# Altium PCB footprint.PcbDoc
Units mm, origin at the board's own origin, x right, y up, seen from the top; angles counter-clockwise.
Board outline 152.4 x 101.6 mm, 2 copper layers (Top Layer, Bottom Layer); 80 components, 0 nets, 626 pads, 2 vias.
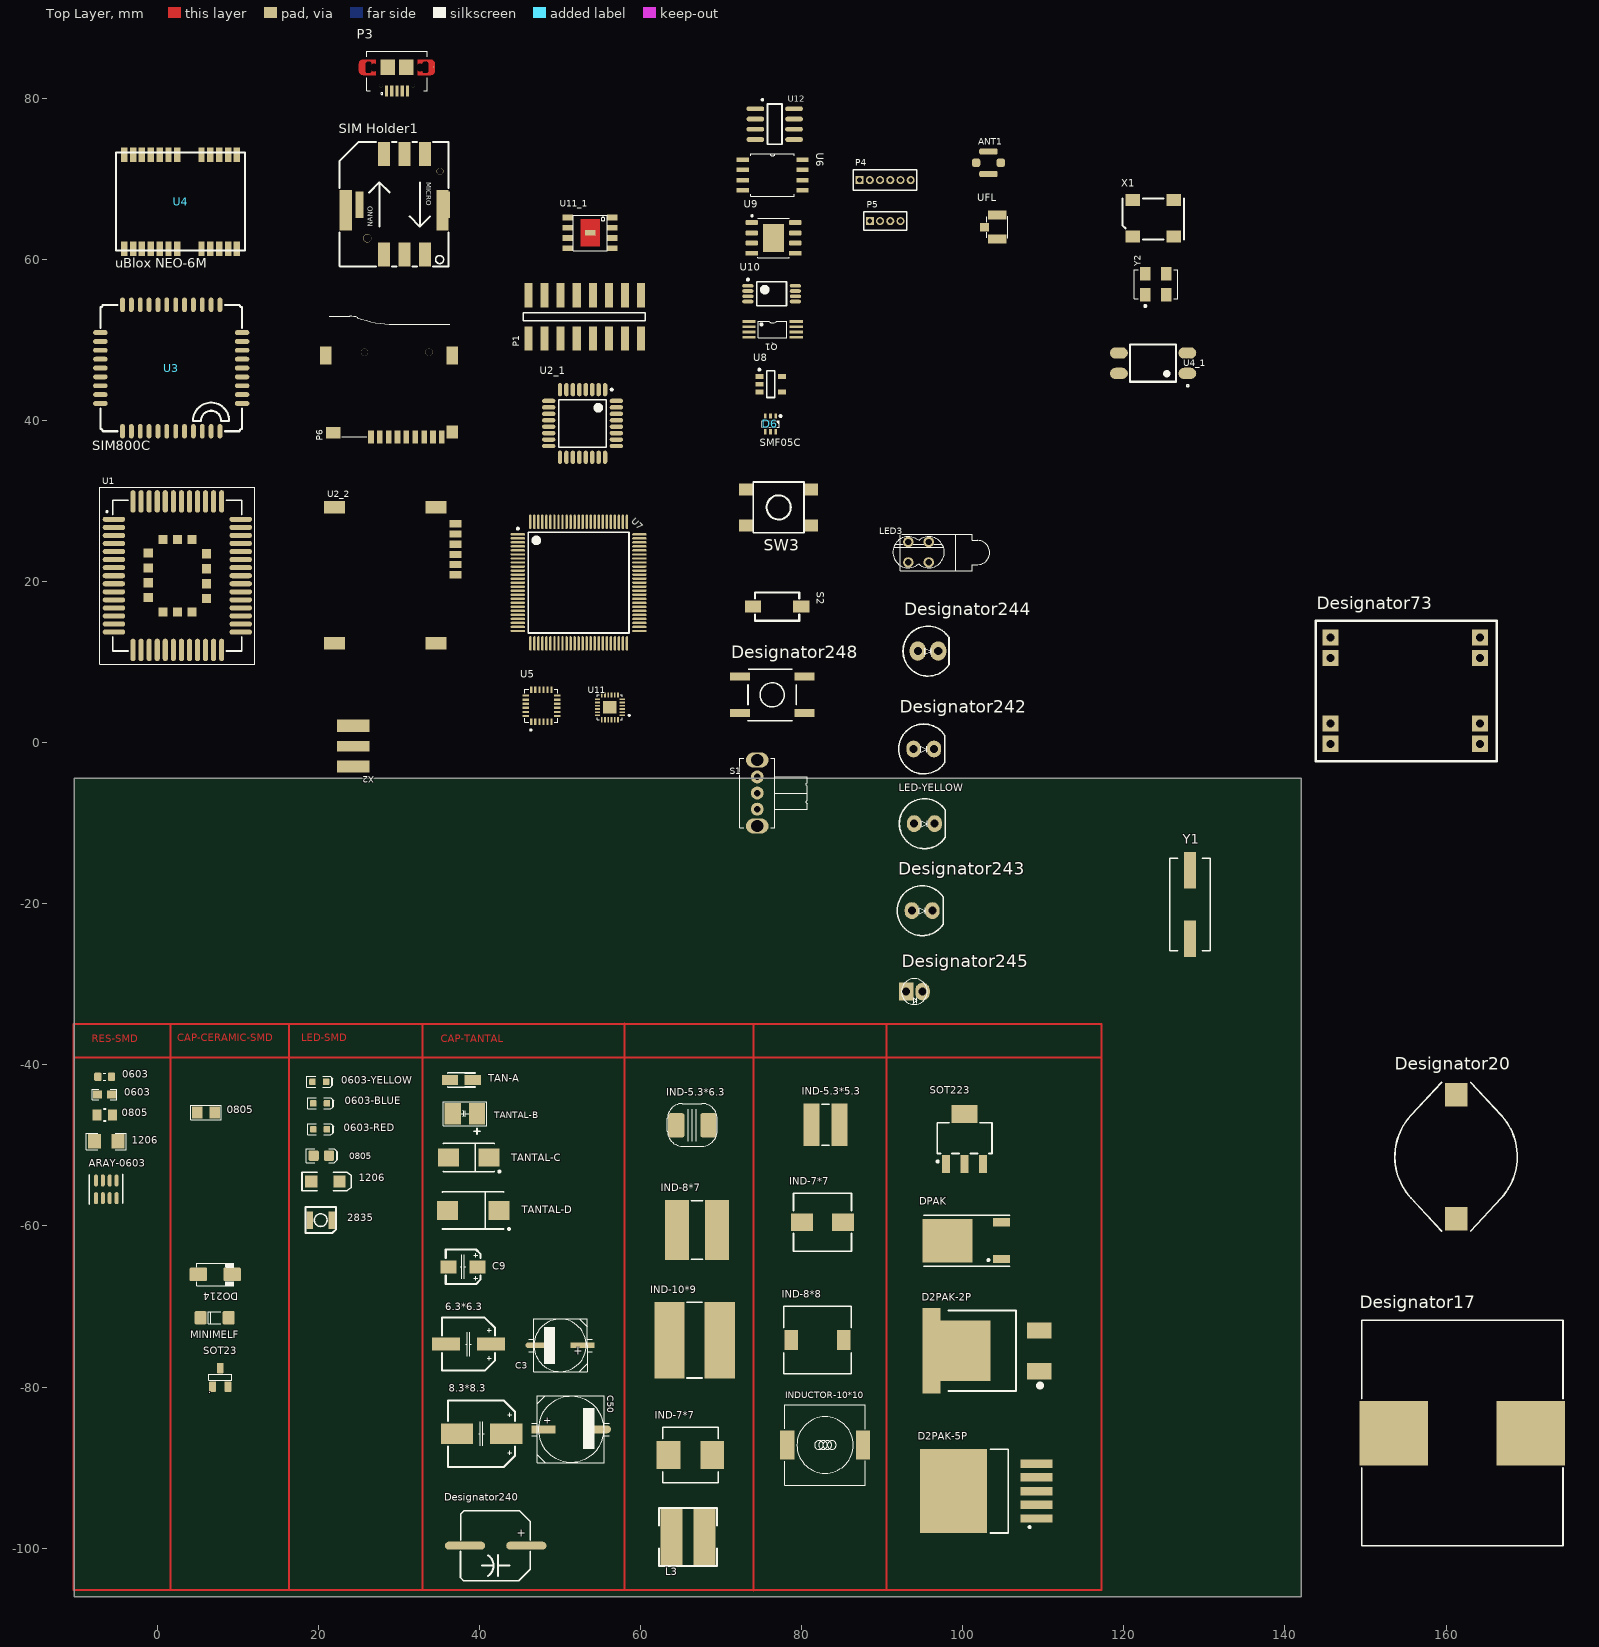
[diagram p0: Top Layer view]
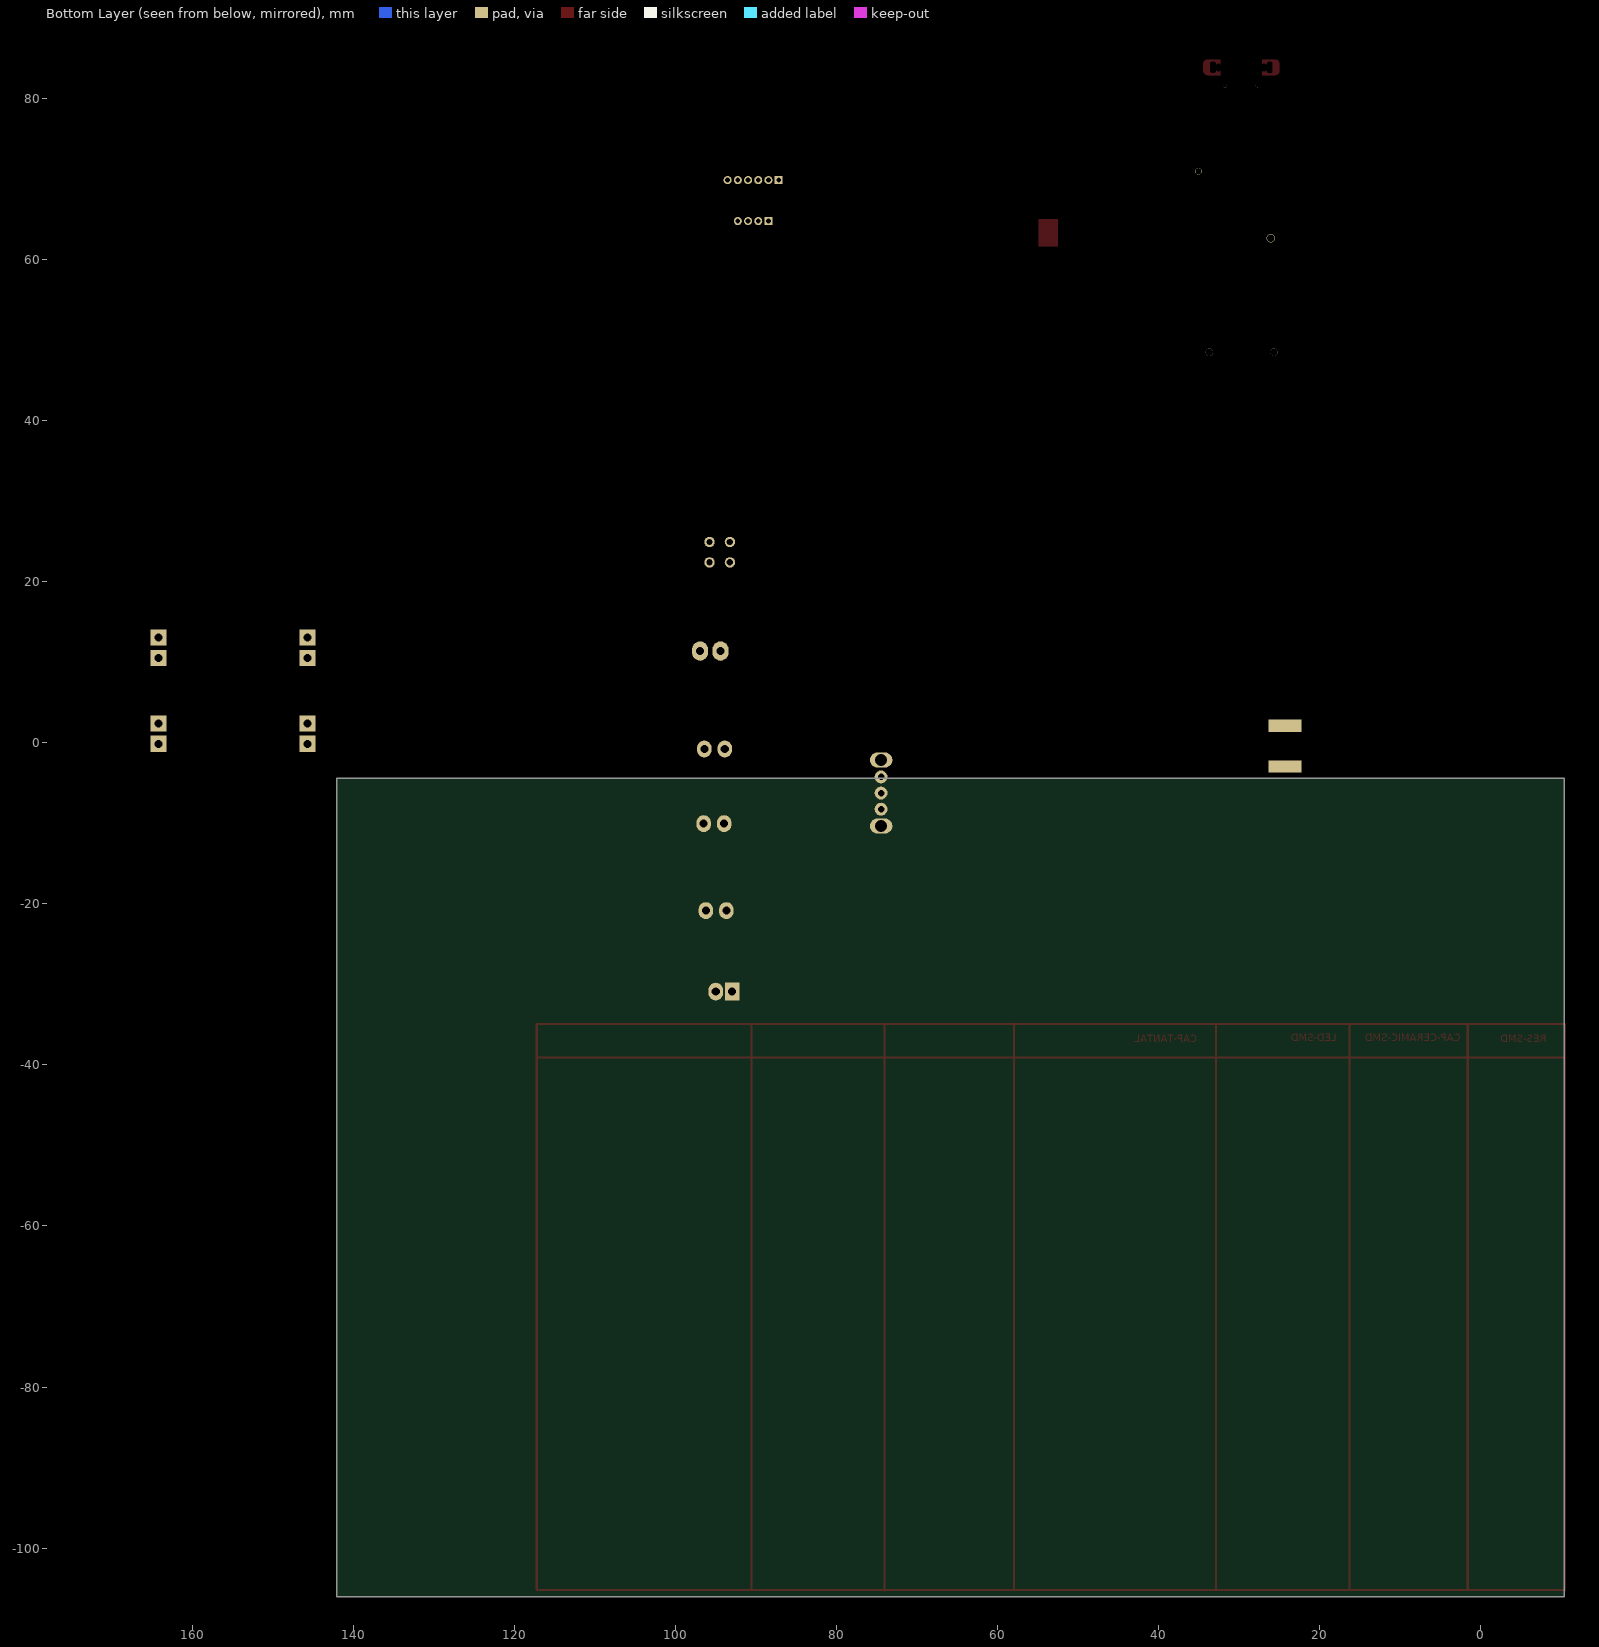
[diagram p1: Bottom Layer view, seen from below]

## Layer stack, top to bottom
Top Solder: solder mask 0.0102, Solder Resist, Dk 3.5
Top Layer: signal copper 0.0356
Dielectric 1: dielectric 0.32, FR-4, Dk 4.8
Bottom Layer: signal copper 0.0356
Bottom Solder: solder mask 0.0102, Solder Resist, Dk 3.5

## Board outline
-10.353,-106.038 142.047,-106.038 142.047,-4.438 -10.353,-4.438

## Design rules (kind name [scope] priority, off if disabled: settings)
Clearance [All] p1: gap=0.2 ignorepadtopadclearanceinfootprint=FALSE
PolygonConnect [All] p1: connectstyle=Relief reliefconductorwidth=0.254 reliefentries=4 polygonreliefangle="90 Angle" airgapwidth=0.254
RoutingVias [All] p1: holewidth=0.711 width=1.27 viastyle="Through Hole" minholewidth=0.711 minwidth=1.27 maxholewidth=0.711 maxwidth=1.27
SolderMaskExpansion [All] p1: expansion=0.102
Width [All] p1: maxlimit=0.254 minlimit=0.254 preferedwidth=0.254
30 further rules are at their usual default settings.

## Components (designator, comment, footprint, x,y, rotation, side; value= is the part's Value field where it differs from the comment)
6.3*6.3 "470uF" CAP_ELEC_D_6.3*5.8 38.625,-74.675 r270 top (schematic designator C15)
8.3*8.3 "100uF" CAP_ELEC_E_8*6.2 40.25,-85.8 r270 top (schematic designator C32)
0603 "Thick Film" 0603R -6.575,-43.7 r180 top (schematic designator R52)
0603 "1k" SMD-RES-0603-ARJ -6.554,-41.463 r180 bottom (schematic designator R4)
0603-BLUE "NET_B" LED-0603-BLUE 20.2,-44.775 r0 bottom (schematic designator LED2)
0603-RED "CHRG_R" LED-0603-RED 20.2,-48 r0 bottom (schematic designator LED4)
0603-YELLOW "GPS_Y" LED-0603-YELLOW 20.1,-42.1 r0 bottom (schematic designator LED3)
0805 "Comment" RES-0805 -6.55,-46.225 r180 top
0805 "RED" LED-0805-K 20.35,-51.275 r0 top (schematic designator LED1)
0805 "approved sub OK" 0805C 6.025,-45.9 r0 top (schematic designator C47)
1206 "Comment" RES-1206 -6.35,-49.5 r180 top
1206 "Comment" "LED 1206" 20.85,-54.475 r0 top
2835 "Comment" 1210(3528) 20.275,-59.275 r180 top
ANT1 "CONNECTOR_ANTENNA-U-FL" CONNECTOR_4P-U-FL 103.185,72.016 r0 top
ARAY-0603 "Comment" ARAY-0603 -6.35,-55.45 r90 top
C3 "100uF-16V" PANACAP-D-GENERIC 50,-74.825 r180 top
C9 "10uF" CAP_ELEC_B_4*5.8 37.95,-65.075 r270 top
C50 "47uF-50V" PANACAP-E-GENERIC 51.375,-85.25 r0 top
D2PAK-2P "Comment" PCBComponent_1 99.175,-75.5 r90 top
D2PAK-5P "Comment" D2PAK-5P 98.85,-92.925 r90 top
D6 "SMF05C" SC70-6 76.119,39.59 r270 top
Designator17 "Comment" WE-HCF_2920_Round 162.025,-85.725 r90 top
Designator20 "Comment" "WE-ASI_Actuator - Type L" 161.25,-51.4 r90 top
Designator73 "Comment" MP1584 154.946,6.471 r90 top
Designator240 "Comment" "CAP SMD 470uF" 42,-99.7 r0 top
Designator242 "Comment" LED5MM_RED 95.15,-0.775 r0 top
Designator243 "Comment" LED5MM_GRN 94.955,-20.85 r0 top
Designator244 "Comment" LED5MM_BLUE 95.68,11.375 r0 top
Designator245 "Comment" LED3mm_GRN 93.984,-30.9 r0 top
Designator248 "Comment" SW-PB#1 76.333,5.95 r0 top
DO214 "SS34" DO-214AC 7.182,-66.004 r0 top (schematic designator D7)
DPAK "Comment" DPAK 98.075,-61.825 r90 top
IND-5.3*5.3 "Comment" WE-SPC_4818 82.95,-47.45 r90 top
IND-5.3*6.3 "Comment" "Inductor SMD 3x3.2mm" 66.425,-47.5 r0 top
IND-7*7 "Comment" WE-HCI_7050#1 82.575,-59.525 r90 top
IND-7*7 "Comment" WE-LHMI_7030 66.175,-88.45 r180 top
IND-8*7 "Comment" WE-ASI_Sensor 67,-60.5 r180 top
IND-8*8 "Comment" WE-CHSA_8090 81.95,-74.175 r0 top
IND-10*9 "Comment" "WE-ASI_Actuator - Type M" 66.7,-74.175 r180 top
INDUCTOR-10*10 "CDRH105R-330" IND_SMD10X10 82.9,-87.2 r270 top (schematic designator L2)
L3 "100UH-7*7" WE-HCI_7050#2 65.875,-98.625 r270 top
LED3 "LTL-42D1NMHDP1" "LED DUAL G&Y" 94.505,23.655 r90 top
LED-YELLOW "Comment" LED5MM_YELLOW 95.225,-10.05 r0 top
MINIMELF "1N4148" "SOD80, LL-34" 7.1,-71.4 r0 top (schematic designator D5)
P1 "16 PIN" NSO16_M 52.493,52.822 r270 top
P3 "Conn Micro USB 2.0 Type B Modified for GPS unit" "HRS_ZX62D-B-5P8 - 1028MMC" 29.749,80.906 r180 top
P4 "MHDR1X6" MHDR1X6 87.183,69.857 r0 top
P5 "MHDR1X4" MHDR1X4 88.453,64.777 r0 top
P6 "ST-TF-003A" SD_CARDSUNTECH_ST-TF-003A_ST-TF-003A(PRIMARY) 30.033,43.314 r180 top
Q1 "IRF7701" TSSOP-8 76.388,51.315 r0 top
S1 "Switch SPDT_Subminiator" "SPDT SUBMINIATOR" 74.475,-6.25 r270 top
S2 "SW-PB" SW-PB#2 76.944,16.898 r0 top
"SIM Holder1" "SIMCARD6PIN" MICRO/NANO-Flat 36.134,73.615 r180 top
SOT23 "C945" SOT23-3 7.8,-78.8 r90 top (schematic designator Q8)
SOT223 "3V3" SOT223 100.225,-49.1 r90 top (schematic designator UP2)
SW3 "Comment" B3FS_SWITCH 77.15,29.217 r0 top
TAN-A "" Cap_A 37.75,-41.875 r180 bottom (schematic designator C28)
TANTAL-B "2.2uF-16V" C(1210) 38.175,-46.075 r180 top (schematic designator C56)
TANTAL-C "100uF-10V" Cap_C 38.65,-51.5 r180 top (schematic designator C31)
TANTAL-D "470uF" Cap_D 39.2,-58.075 r180 top (schematic designator C14)
U1 "MC60" XCVR_MC60 2.474,20.739 r0 top
U2_1 "ATmega328P-AU" 32A_N 52.785,39.64 r270 top (schematic designator U2)
U2_2 "CONNECTOR_MICROSIM" CONNECTOR_MICROSIM 36.205,28.426 r180 top (schematic designator U2)
U3 "SIM800C" SIM800C 1.714,46.526 r270 top
U4 "uBlox NEO-6M" NEO_6 -5.126,61.094 r270 top
U4_1 "PC817X2NIP0F" SOT254P975X400-4N 123.632,47.124 r180 top (schematic designator U4)
U5 "MPU-6050 Six-Axis (Gyro + Accelerometer) MEMS MotionTracking™ Devices" QFN50P400X400X95-24N 47.686,4.579 r90 top
U6 "32-megabit DataFlash" SOIC127P798X216-8N 76.388,70.492 r0 top
U7 "STM32F407VGT6" STM-LQFP100_N 52.298,19.876 r0 top
U8 "PQ1X331M2ZPH" SOT95P280X130-5N 76.137,44.518 r0 top
U9 "3A, 1.5MHz, 28V Step-Down Converter" SOIC9 76.496,62.684 r0 top
U10 "FS8205A" TSSOP-8N 76.261,55.76 r0 top
U11 "MPU-9250" QFN40P300X300X105-25N 56.174,4.398 r180 top (schematic designator U3)
U11_1 "TP4056" SOP-8 53.725,63.31 r180 bottom locked (schematic designator U11)
U12 "TS02" "TS02N - SOP8" 74.105,78.301 r0 top (schematic designator U5)
UFL "U.FL Series" U.FL-R-SMT 104.275,64.025 r270 top (schematic designator J2)
X1 "Crystal resonator" "Crystal Oscillator - 8MHz" 121.092,63.122 r0 top
X2 "SMA Connector Edge" SMA_EDGELAUNCH 26.35,-0.425 r180 top
Y1 "16 MHz" "Crystal SMD" 128.21,-20.075 r270 top value="12 MHz"
Y2 "7C-8MBF-T" OSC_5X3 123.983,56.933 r0 top

## Footprints (in the part's own frame and the unit in brackets; to place one, negate y for a bottom-side part, rotate by r counter-clockwise, add the part's x,y. Pads: shape width x height; smd on the part's side, far side on the other; paste and mask are expansions set on the pad)
32A_N [mm] "Thin QFP, 32-Leads, Body 7x7mm, Pitch 0.8mm, IPC Medium Density"
  oval 1.65x0.55 smd: 1(-4.2,2.8) 2(-4.2,2) 3(-4.2,1.2) 4(-4.2,0.4) 5(-4.2,-0.4) 6(-4.2,-1.2) 7(-4.2,-2) 8(-4.2,-2.8) 17(4.2,-2.8) 18(4.2,-2) 19(4.2,-1.2) 20(4.2,-0.4) 21(4.2,0.4) 22(4.2,1.2) 23(4.2,2) 24(4.2,2.8)
  oval 0.55x1.65 smd: 9(-2.8,-4.2) 10(-2,-4.2) 11(-1.2,-4.2) 12(-0.4,-4.2) 13(0.4,-4.2) 14(1.2,-4.2) 15(2,-4.2) 16(2.8,-4.2) 25(2.8,4.2) 26(2,4.2) 27(1.2,4.2) 28(0.4,4.2) 29(-0.4,4.2) 30(-1.2,4.2) 31(-2,4.2) 32(-2.8,4.2)
  silkscreen extent -4.32,-2.95 2.95,3.75, body extent -3.5,-3.5 3.5,3.5, height 1.2
0603R [mm]
  rect 1.1x1 smd: 1(-0.85,0) 2(0.85,0)
  Top Layer pour cut-out: -0.254,-0.635 0.254,-0.635 0.254,0.635 -0.254,0.635
  silkscreen extent -1.55,-0.66 1.55,0.66, body extent -0.8,-0.42 0.8,0.43, height 0.45
0805C [mil]
  rect 51x59 smd: 1(-43.31,0) 2(43.31,0)
  Top Layer pour cut-out: 15,35 15,-35 -15,-35 -15,35
  silkscreen extent -75,-35 75,35, body extent -39,-25 39,25, height 31
1210(3528) [mm]
  rect 0.8x2.2 smd mask+0: +(1.35,0) -(-1.35,0)
  silkscreen extent -1.9,-1.6 1.9,1.6
ARAY-0603 [mm]
  oval 1.5x0.5 smd: 1(1.1,1.275) 2(1.1,0.425) 3(1.1,-0.425) 4(1.1,-1.275) 5(-1.1,-1.275) 6(-1.1,-0.425) 7(-1.1,0.425) 8(-1.1,1.275)
  silkscreen extent -1.83,-2.05 1.85,2.1
B3FS_SWITCH [mm]
  rect 1.8x1.5 smd: 1(3.998,-2.244) 2(-4.012,-2.244) 3(3.998,2.246) 4(-4.012,2.246)
  silkscreen extent -3.17,-3.15 3.14,3.16, body extent -4.57,-3.15 4.57,3.16, height 4.57
C(1210) [mm]
  rect 2x2.7 smd: 1(-1.5,0) 2(1.5,0)
  silkscreen extent -2.69,-1.5 2.69,2.54, body extent -1.85,-1.46 1.85,1.47, height 2.03
"CAP SMD 470uF" [mm] "SMD CAP 470uF"
  oval 5x1 smd: 1(3.81,0) 2(-3.81,0)
  silkscreen extent -4.37,-4.34 4.29,4.34, body extent -4.53,-4.15 4.47,4.15, height 12
Cap_A [mm] "Capacitor, SM Tantalum; Body 3.2 x 1.6 mm (LxW typ)"
  rect 2x1.2 smd far side: 1(-1.4,0) 2(1.4,0)
  body extent -1.6,-0.8 1.6,0.8, height 1.6
Cap_C [mm] "Capacitor, SM Tantalum; Body 6.0 x 3.2 mm (LxW typ)"
  rect 2.6x2.2 smd: 1(-2.5,0) 2(2.5,0)
  silkscreen extent -3.93,-1.75 3.15,1.87, body extent -3,-1.6 3,1.6, height 2.5
Cap_D [mm] "Capacitor, SM Tantalum; Body 7.3 x 4.3 mm (LxW typ)"
  rect 2.6x2.4 smd: 1(-3.2,0) 2(3.2,0)
  silkscreen extent -4.58,-2.3 3.8,2.42, body extent -3.65,-2.15 3.65,2.15, height 2.8
CAP_ELEC_B_4*5.8 [mm] "Size B - Diameter 4 - Height 5.8"
  rect 1.6x2 smd: 1(0,1.8) 2(0,-1.8)
  silkscreen extent -2.15,-2.15 2.15,2.15
CAP_ELEC_D_6.3*5.8 [mm] "Size D - Diameter 6.3 - Height 5.8"
  rect 1.6x3.5 smd: 1(0,2.8) 2(0,-2.8)
  silkscreen extent -3.3,-3.3 3.3,3.3
CAP_ELEC_E_8*6.2 [mm] "Size E - Diameter 8 - Height 6.2"
  rect 2.5x4 smd: 1(0,3.05) 2(0,-3.05)
  silkscreen extent -4.15,-4.15 4.15,4.15
CONNECTOR_4P-U-FL [mil]
  rrect50% 40x40 smd: D(-60,0) GND3(60,0)
  rrect50% 90x30 smd: GND1(0,55) GND2(0,-55)
CONNECTOR_MICROSIM [mil]
  rect 59.06x35.43 smd: 1(-31.5,98.43) 2(-31.5,198.43) 3(-31.5,298.43) 5(-31.5,48.43) 6(-31.5,148.43) 7(-31.5,248.43)
  rect 102.76x61.42 smd: 5(62.99,633.86) 5(62.99,-31.5) 5(559.06,633.86) 5(559.06,-31.5)
  body extent -43,-23 635,627, height 61
"Crystal Oscillator - 8MHz" [mm]
  rect 1.8x1.5 smd: 1(0,-0.25) 2(5.08,-0.25) 3(5.08,4.25) 4(0,4.25)
  silkscreen extent -1.27,-0.64 6.35,4.44
"Crystal SMD" [mm] "DESIGNER ABBAS BASEREH"
  rect 4.5x1.5 smd: 1(-4.25,0) 2(4.25,0)
  silkscreen extent -5.75,-2.5 5.75,2.5, body extent -6.21,-2.25 6.09,2.25, height 5.18
D2PAK-5P [mm]
  rect 1.05x4 smd: 1(-3.4,-10.3) 2(-1.7,-10.3) 3(0,-10.3) 4(1.7,-10.3) 5(3.4,-10.3)
  rect 10.45x8.3 smd paste-5: 6(0,0)
  silkscreen extent -5.2,-9.58 5.2,-4.55, body extent -5.2,-6.8 5.2,2.6, height 4.65
DO-214AC [mm] "JEDEC DO214 variation AC. SMA"
  round 0.508 on Mech15: 0(0,0)
  rrect25% 2.2x1.7 smd: A(-2.1,0) K(2.1,0)
  silkscreen extent -2.3,-1.4 2.3,1.4, body extent -2.6,-1.3 2.6,1.3, height 2.42
DPAK [mm]
  rect 1x2.1 smd: 1(-2.285,-6.75) 3(2.285,-6.75)
  rect 5.4x6.2 smd paste-3: 2(0,0)
  silkscreen extent -3.17,-7.77 3.18,2.93, body extent -3.39,-6.85 3.34,3.25, height 2.4
"HRS_ZX62D-B-5P8 - 1028MMC" [mm]
  rect 0.4x1.372 smd: 1(1.3,0) 2(0.65,0) 3(0,0) 4(-0.65,0) 5(-1.3,0)
  round 0.61 hole 1: 6(-2.85,-2.95) 6(2.85,-2.95)
  round 0.406 hole 0.5: 6(-2,-0.675) 6(2,-0.675)
  rect 0.102x0.102 smd: P3(-4.513,-2.987) P6(4.521,-2.963)
  rect 1.803x1.905 smd: P4(-1.15,-2.95) P5(1.15,-2.95)
  Top Layer region: -2.6,-2 -4.2,-2 -4.391,-2.038 -4.554,-2.146 -4.662,-2.309 -4.7,-2.5 -4.7,-2.5 -4.7,-2.95 -3.925,-2.95 -3.925,-2.5 -3.902,-2.385 -3.837,-2.288 -3.74,-2.223 -3.625,-2.2 -3.625,-2.2 -3.4,-2.2 -3.285,-2.223 -3.188,-2.288 -3.123,-2.385 -3.1,-2.5 -3.1,-2.5 -3.1,-2.95 -2.6,-2.95
  Top Layer region: 2.616,-3.9 4.216,-3.9 4.41,-3.863 4.574,-3.755 4.685,-3.593 4.724,-3.4 4.724,-3.4 4.724,-2.95 3.937,-2.95 3.937,-3.4 3.913,-3.516 3.847,-3.613 3.748,-3.678 3.632,-3.7 3.632,-3.7 3.404,-3.7 3.294,-3.674 3.202,-3.608 3.142,-3.512 3.124,-3.4 3.124,-3.4 3.124,-2.95 2.616,-2.95
  Top Layer region: -3.1,-2.95 -2.6,-2.95 -2.6,-3.9 -4.2,-3.9 -4.45,-3.833 -4.633,-3.65 -4.7,-3.4 -4.7,-3.4 -4.7,-2.95 -3.925,-2.95 -3.925,-3.425 -3.904,-3.53 -3.844,-3.619 -3.755,-3.679 -3.65,-3.7 -3.65,-3.7 -3.4,-3.7 -3.285,-3.677 -3.188,-3.612 -3.123,-3.515 -3.1,-3.4 -3.1,-3.4
  Top Layer region: 3.124,-2.95 2.616,-2.95 2.616,-2 4.216,-2 4.41,-2.037 4.574,-2.145 4.685,-2.307 4.724,-2.5 4.724,-2.5 4.724,-2.95 3.937,-2.95 3.937,-2.475 3.915,-2.369 3.854,-2.28 3.764,-2.22 3.658,-2.2 3.658,-2.2 3.404,-2.2 3.294,-2.226 3.202,-2.292 3.142,-2.388 3.124,-2.5 3.124,-2.5
  silkscreen extent -3.75,-4.95 3.76,0.43
IND_SMD10X10 [mm]
  rect 3.56x1.78 smd: 1(0,-4.7) 2(0,4.7)
  silkscreen extent -5,-5 5,5, body extent -5.21,-5.2 5.19,5.2, height 4.91
"Inductor SMD 3x3.2mm" [mm] "Inductor 4.7µH SMD 3x3.2mm"
  round 0.508 on Mech15: 0(0,0)
  rrect25% 2x3 smd: 1(-2,0) 2(2,0)
  silkscreen extent -3.1,-2.6 3.1,2.7, body extent -2.9,-2.6 2.89,2.6, height 4.5
LED3mm_GRN [mm]
  rect 1.8x2.2 hole 1: 1(-1.016,0)
  oval 1.8x2.2 hole 1: 2(1.016,0)
  silkscreen extent -1.6,-1.6 1.6,1.6, body extent -1.75,-1.75 1.75,1.75, height 3.9
LED5MM_BLUE [mm] "LED 5MM THROUGH HOLE BLUE-Designer Abbas Basereh"
  oval 2x2.4 hole 1: 1(-1.27,0) 2(1.27,0)
  silkscreen extent -3.1,-3.1 2.6,3.1, body extent -2.99,-2.98 2.43,3.04, height 12.31
LED5MM_GRN [mm] "LED 5MM THROUGH HOLE GREEN-Designer Abbas Basereh"
  oval 1.8x2.1 hole 1: 1(-1.27,0) 2(1.27,0)
  silkscreen extent -3.1,-3.1 2.6,3.1, body extent -3,-3 2.5,3, height 9.14
LED5MM_RED [mm] "LED 5MM THROUGH HOLE RED-Designer Abbas Basereh"
  oval 1.8x2.1 hole 1: 1(-1.27,0) 2(1.27,0)
  silkscreen extent -3.1,-3.1 2.6,3.1, body extent -2.97,-3 2.45,3.02, height 12.31
LED5MM_YELLOW [mm] "LED 5MM THROUGH HOLE YELLOW-Designer Abbas Basereh"
  oval 1.8x2.1 hole 1: 1(-1.27,0) 2(1.27,0)
  silkscreen extent -3.1,-3.1 2.6,3.1, body extent -3,-3.01 2.42,3.01, height 12.31
"LED 1206" [mm]
  rect 1.5x1.5 smd: 1(-1.75,0) 2(1.75,0)
  silkscreen extent -2.9,-1.15 3.2,1.15, body extent -1.65,-0.72 1.65,0.73, height 1.36
"LED DUAL G&Y" [mm]
  round 1.3 hole 0.8: 1(-1.27,1.27) 2(1.27,1.27) 3(-1.27,-1.27) 4(1.27,-1.27)
  silkscreen extent -2.29,-8.83 2.21,3.2, body extent -2.18,-10.09 2.12,2.3, height 9.7
LED-0603-BLUE [mm]
  round 0.254 on Mech15: 0(0,0)
  rrect25% 0.8x0.8 smd far side: A(-0.85,0) K(0.85,0)
  Top Layer pour cut-out: -0.5,0.5 0.5,0.5 0.5,-0.5 -0.5,-0.5
  body extent -0.8,-0.4 0.8,0.4, height 0.75
LED-0603-RED [mm]
  round 0.254 on Mech15: 0(0,0)
  rrect25% 0.8x0.8 smd far side: A(-0.85,0) K(0.85,0)
  Top Layer pour cut-out: -0.5,0.5 0.5,0.5 0.5,-0.5 -0.5,-0.5
  body extent -0.8,-0.4 0.8,0.4, height 0.75
LED-0603-YELLOW [mm]
  round 0.254 on Mech15: 0(0,0)
  rrect25% 0.8x0.8 smd far side: A(-0.85,0) K(0.85,0)
  Top Layer pour cut-out: -0.5,0.5 0.5,0.5 0.5,-0.5 -0.5,-0.5
  body extent -0.8,-0.4 0.8,0.4, height 0.75
LED-0805-K [mil]
  round 20 on Mech15: 0(0,0)
  rrect25% 50x50 smd: A(-37.5,0) K(37.5,0)
  Top Layer pour cut-out: -15,30 15,30 15,-30 -15,-30
  silkscreen extent -73,-35 77,35, body extent -39,-25 39,25, height 31
MHDR1X4 [mm] "Connector; Header; 4 Position"
  rect 1x1 hole 0.6: 1(0,0)
  round 1 hole 0.6: 2(1.27,0) 3(2.54,0) 4(3.81,0)
  silkscreen extent -0.76,-1.14 4.57,1.14, body extent -0.63,-1.2 4.45,1.2, height 4.85
MHDR1X6 [mm] "Connector; Header; 6 Position"
  rect 1x1 hole 0.6: 1(0,0)
  round 1 hole 0.6: 2(1.27,0) 3(2.54,0) 4(3.81,0) 5(5.08,0) 6(6.35,0)
  silkscreen extent -0.76,-1.27 7.11,1.27, body extent -0.63,-1.2 6.99,1.2, height 4.85
MICRO/NANO-Flat [mm]
  rect 1.5x3 smd: 1(2.9,13) 2(5.44,13) 3(7.98,13) 4(2.9,0.5) 5(5.44,0.5) 6(7.98,0.5)
  rect 0.9x1 smd: 1(3.18,12.775) 2(5.72,12.775) 3(8.26,12.775) 4(3.18,0.825) 5(5.72,0.825) 6(8.26,0.825)
  rect 1x3.29 smd: 4(0.28,6.805) 4(11.05,6.805)
  rect 1.5x5 smd: 4(0.75,7.5) 4(12.75,7.5)
  silkscreen extent 0,-1 13.5,14.5, body extent 1.6,0.55 11.95,13.1, height 1.03
MP1584 [mm]
  rect 2x2 hole 1: 1(4.064,-9.271) 1(6.604,-9.271) 2(-6.604,-9.271) 2(-4.064,-9.271) 3(4.064,9.271) 3(6.604,9.271) 4(-6.604,9.271) 4(-4.064,9.271)
  silkscreen extent -8.79,-11.35 8.69,11.13, body extent -8.55,-11.1 8.45,10.9, height 6.26
NEO_6 [mm]
  rect 1.8x0.8 smd: 1(-0.254,1) 2(-0.254,2.1) 3(-0.254,3.2) 4(-0.254,4.3) 5(-0.254,5.4) 6(-0.254,6.5) 7(-0.254,7.6) 8(-0.254,10.6) 9(-0.254,11.7) 10(-0.254,12.8) 11(-0.254,13.9) 12(-0.254,15) 13(-11.938,15) 14(-11.938,13.9) 15(-11.938,12.8) 16(-11.938,11.7) 17(-11.938,10.6) 18(-11.938,7.6) 19(-11.938,6.5) 20(-11.938,5.4) 21(-11.938,4.3) 22(-11.938,3.2) 23(-11.938,2.1) 24(-11.938,1)
  silkscreen extent -12.19,0 0,16
NSO16_M [mm] "SOIC, 16-Leads, Body 9.9x3.9mm, Pitch 1.27mm, IPC Low Density"
  rect 3x1 smd: 1(-2.75,-6.425) 2(-2.75,-4.425) 3(-2.75,-2.425) 4(-2.75,-0.425) 5(-2.75,1.575) 6(-2.75,3.575) 7(-2.75,5.575) 8(-2.75,7.575) 9(2.65,7.575) 10(2.65,5.575) 11(2.65,3.575) 12(2.65,1.575) 13(2.65,-0.425) 14(2.65,-2.425) 15(2.65,-4.425) 16(2.65,-6.425)
  silkscreen extent -0.58,-7.05 0.43,8.1
OSC_5X3 [mm]
  rect 1.3x1.7 smd mask+0.15: 1(-1.3,-1.3) 2(1.3,-1.3) 3(1.3,1.3) 4(-1.3,1.3)
  silkscreen extent -2.7,-2.82 2.7,1.8, body extent -2.57,-1.67 2.58,1.68, height 1.4
PANACAP-D-GENERIC [mm]
  rect 3x0.7 smd: +(-2.794,0)
  oval 3x0.7 smd: -(2.794,0)
  silkscreen extent -4,-3.3 3.92,3.3, body extent -3.5,-3.3 3.5,3.3, height 5.4
PANACAP-E-GENERIC [mm]
  rect 3x1 smd: 1(-3.429,0)
  oval 3x1 smd: 2(3.429,0)
  silkscreen extent -4.87,-4.15 4.75,4.15, body extent -4.63,-4.15 4.37,4.15, height 6.2
PCBComponent_1 [mm]
  rect 2x3 smd: 1(-2.54,-10.325) 2(2.54,-10.325)
  rect 2.032x2.286 smd paste-2: 3(-4.267,3.06) 3(4.267,3.06)
  rect 7.5x8.45 smd paste-5: 3(0,-0.025)
  silkscreen extent -5,-10.68 5,1
QFN40P300X300X105-25N [mm]
  rect 0.64x0.22 smd: 1(-1.545,1) 2(-1.545,0.6) 3(-1.545,0.2) 4(-1.545,-0.2) 5(-1.545,-0.6) 6(-1.545,-1) 13(1.545,-1) 14(1.545,-0.6) 15(1.545,-0.2) 16(1.545,0.2) 17(1.545,0.6) 18(1.545,1)
  rect 0.22x0.64 smd: 7(-1,-1.545) 8(-0.6,-1.545) 9(-0.2,-1.545) 10(0.2,-1.545) 11(0.6,-1.545) 12(1,-1.545) 19(1,1.545) 20(0.6,1.545) 21(0.2,1.545) 22(-0.2,1.545) 23(-0.6,1.545) 24(-1,1.545)
  rect 1.7x1.54 smd: 25(0,0)
  silkscreen extent -2.5,-1.55 1.55,1.55, body extent -1.51,-1.51 1.51,1.51, height 1
QFN50P400X400X95-24N [mil]
  rect 32x11 smd: 1(-77.56,50) 2(-77.56,30) 3(-77.56,10) 4(-77.56,-9.84) 5(-77.56,-29.53) 6(-77.56,-49.21) 13(78,-49.21) 14(78,-29.53) 15(78,-9.84) 16(78,10) 17(78,30) 18(78,50)
  rect 11x32 smd: 7(-49.21,-77.56) 8(-29.53,-77.56) 9(-9.84,-77.56) 10(10,-77.56) 11(30,-77.56) 12(50,-77.56) 19(50,78) 20(30,78) 21(10,78) 22(-9.84,78) 23(-29.53,78) 24(-49.21,78)
  silkscreen extent -122,-81 81,81
RES-0805 [mm]
  rect 1.1x1.4 smd: 2(-0.962,0) 2(0.962,0)
  silkscreen extent -0.14,-0.75 0.14,0.75, body extent -1.02,-0.63 1.02,0.64, height 0.6
RES-1206 [mm]
  rect 1.6x1.8 smd: 1(1.475,0) 2(-1.475,0)
  silkscreen extent -2.5,-1.02 2.5,1.02, body extent -1.65,-0.85 1.65,0.85, height 0.94
SC70-6 [mm] "SC70-6; SOT-363"
  round 0.254 on Mech15: 0(0,0)
  rrect25% 0.65x0.35 smd: 1(-0.975,0.65) 2(-0.975,0) 3(-0.975,-0.65) 4(0.975,-0.65) 5(0.975,0) 6(0.975,0.65)
  silkscreen extent -1.1,-1.1 0.4,1.38, body extent -1.2,-1.1 1.2,1.1, height 1.1
SD_CARDSUNTECH_ST-TF-003A_ST-TF-003A(PRIMARY) [mm]
  rect 0.7x1.6 smd: 1(3.52,5.33) 2(2.42,5.33) 3(1.32,5.33) 4(0.22,5.33) 5(-0.88,5.33) 6(-1.98,5.33) 7(-3.08,5.33) 8(-4.18,5.33) 9(-5.28,5.33)
  rect 1.4x1.6 smd: G1(-6.58,4.73)
  rect 1.4x2.2 smd: G2(-6.58,-4.77) G3(9.12,-4.77)
  rect 1.8x1.4 smd: G4(8.22,4.83)
  round 0.9 hole 0.9 unplated: None(-3.68,-5.17) None(4.32,-5.17)
  silkscreen extent -6.29,-9.66 8.7,5.33, body extent -6.68,-11.11 9.72,5.54, height 1.78
SIM800C [mm]
  oval 1.8x0.6 smd: 1(-7.85,6.05) 2(-7.85,4.95) 3(-7.85,3.85) 4(-7.85,2.75) 5(-7.85,1.65) 6(-7.85,0.55) 7(-7.85,-0.55) 8(-7.85,-1.65) 9(-7.85,-2.75) 10(-7.85,-3.85) 11(-7.85,-4.95) 12(-7.85,-6.05) 22(7.85,-6.05) 23(7.85,-4.95) 24(7.85,-3.85) 25(7.85,-2.75) 26(7.85,-1.65) 27(7.85,-0.55) 28(7.85,0.55) 29(7.85,1.65) 30(7.85,2.75) 31(7.85,3.85) 32(7.85,4.95) 33(7.85,6.05)
  oval 0.6x1.8 smd: 13(-4.4,-8.8) 14(-3.3,-8.8) 15(-2.2,-8.8) 16(-1.1,-8.8) 17(0,-8.8) 18(1.1,-8.8) 19(2.2,-8.8) 20(3.3,-8.8) 21(4.4,-8.8) 34(4.4,8.8) 35(3.3,8.8) 36(2.2,8.8) 37(1.1,8.8) 38(0,8.8) 39(-1.1,8.8) 40(-2.2,8.8) 41(-3.3,8.8) 42(-4.4,8.8)
  silkscreen extent -7.85,-8.8 7.85,8.8, body extent -7.85,-8.8 7.85,8.8, height 2.37
SMA_EDGELAUNCH [mil]
  rect 160x60 smd paste-80: GND@1(80,-100) GND@2(80,100)
  rect 160x60 smd far side paste-80: GND@3(80,100) GND@4(80,-100)
  rect 160x50 smd paste-80: P(80,0)
  body extent -365,-130 160,122, height 325
SMD-RES-0603-ARJ [mm]
  round 0.254 on Mech15: 0(-0.004,-0.012)
  rrect25% 0.9x1 smd far side: 1(-0.854,-0.012) 2(0.846,-0.012)
  Top Layer pour cut-out: -0.654,0.488 -0.454,0.688 0.446,0.688 0.646,0.488 0.646,-0.512 0.446,-0.712 -0.454,-0.712 -0.654,-0.512
  body extent -0.85,-0.46 0.85,0.44, height 0.79
"SOD80, LL-34" [mm] "Diode, MiniMELF"
  round 0.5 on Mech15: 0(0,0)
  rrect25% 1.5x1.65 smd paste+0.2: A(1.75,0) K(-1.75,0)
  silkscreen extent -0.76,-0.76 0.76,0.76, body extent -1.8,-0.75 1.8,0.75, height 1.47
SOIC9 [mm]
  rrect54% 1.6x0.61 smd: 1(-2.7,1.905) 2(-2.7,0.625) 3(-2.7,-0.625) 4(-2.7,-1.905) 5(2.7,-1.905) 6(2.7,-0.625) 7(2.7,0.625) 8(2.7,1.905)
  rect 2.62x3.51 smd: 5(0,0)
  silkscreen extent -2.77,-2.45 1.96,2.84
SOIC127P798X216-8N [mil]
  rect 61x21 smd: 1(-146,75) 2(-146,25) 3(-146,-25) 4(-146,-75) 5(146,-75) 6(146,-25) 7(146,25) 8(146,75)
  silkscreen extent -106,-105 106,105
SOP-8 [mil]
  rect 52x28 smd far side: 1(109,75) 2(109,25) 3(0,0) 3(109,-25) 4(109,-75) 5(-108.27,-75) 6(-108.27,-25) 7(-108.27,25) 8(-108.27,75)
  Bottom Layer region: -47.24,67 48,67 48,-66.93 -47.24,-66.93
SOT23-3 [mm] "SOT23, 3 pin"
  round 0.5 on Mech15: 0(0,0)
  rrect25% 1.3x0.85 smd: 1(-1.15,0.95) 2(-1.15,-0.95) 3(1.15,0)
  silkscreen extent -0.38,-1.45 0.38,1.45, body extent -1.4,-1.45 1.4,1.45, height 1.29
SOT95P280X130-5N [mm] "SOT23, 5-Leads, Body 2.90x2.80mm, Pitch 0.95mm, IPC Medium Density"
  rect 1x0.6 smd: 1(-1.4,0.95) 2(-1.4,0) 3(-1.4,-0.95) 4(1.4,-0.95) 5(1.4,0.95)
  silkscreen extent -1.52,-1.65 0.5,1.92, body extent -0.9,-1.65 0.9,1.65, height 1.3
SOT223 [mm] "SOT223, 4-Leads, Body 6.5x3.5mm, Pitch 2.30mm-Designer Abbas Basereh"
  rect 2.2x1 smd: 1(-3.2,2.3) 2(-3.2,0) 3(-3.2,-2.3)
  rect 2.2x3.2 smd: 4(3,0)
  Top Layer pour cut-out: -1.7,3.556 1.7,3.556 1.7,-3.556 -1.7,-3.556
  silkscreen extent -3.02,-3.4 1.9,3.47, body extent -3.5,-3.25 3.5,3.25, height 1.7
SOT254P975X400-4N [mil]
  oval 87x56 smd: 1(-167.32,50) 2(-167.32,-50) 3(167.32,-50) 4(167.32,50)
  silkscreen extent -175,-91 112,116, body extent -197,-90 197,90, height 149
"SPDT SUBMINIATOR" [mm] "Subminiator SPDT switch"
  round 1.6 hole 0.8: 1(2,0) 2(0,0) 3(-2,0)
  oval 1.9x2.8 hole 1.5: M2(-4.1,0) M2(4.1,0)
  silkscreen extent -4.3,-2.2 4.3,6.2, body extent -4.31,-2.28 4.3,6.09, height 4.7
STM-LQFP100_N [mm] "Thin QFP, 100-Leads, Body 14x14mm, Pitch 0.5mm, IPC Medium Density"
  oval 1.8x0.3 smd: 1(-7.55,6) 2(-7.55,5.5) 3(-7.55,5) 4(-7.55,4.5) 5(-7.55,4) 6(-7.55,3.5) 7(-7.55,3) 8(-7.55,2.5) 9(-7.55,2) 10(-7.55,1.5) 11(-7.55,1) 12(-7.55,0.5) 13(-7.55,0) 14(-7.55,-0.5) 15(-7.55,-1) 16(-7.55,-1.5) 17(-7.55,-2) 18(-7.55,-2.5) 19(-7.55,-3) 20(-7.55,-3.5) 21(-7.55,-4) 22(-7.55,-4.5) 23(-7.55,-5) 24(-7.55,-5.5) 25(-7.55,-6) 51(7.55,-6) 52(7.55,-5.5) 53(7.55,-5) 54(7.55,-4.5) 55(7.55,-4) 56(7.55,-3.5) 57(7.55,-3) 58(7.55,-2.5) 59(7.55,-2) 60(7.55,-1.5) 61(7.55,-1) 62(7.55,-0.5) 63(7.55,0) 64(7.55,0.5) 65(7.55,1) 66(7.55,1.5) 67(7.55,2) 68(7.55,2.5) 69(7.55,3) 70(7.55,3.5) 71(7.55,4) 72(7.55,4.5) 73(7.55,5) 74(7.55,5.5) 75(7.55,6)
  oval 0.3x1.8 smd: 26(-6,-7.55) 27(-5.5,-7.55) 28(-5,-7.55) 29(-4.5,-7.55) 30(-4,-7.55) 31(-3.5,-7.55) 32(-3,-7.55) 33(-2.5,-7.55) 34(-2,-7.55) 35(-1.5,-7.55) 36(-1,-7.55) 37(-0.5,-7.55) 38(0,-7.55) 39(0.5,-7.55) 40(1,-7.55) 41(1.5,-7.55) 42(2,-7.55) 43(2.5,-7.55) 44(3,-7.55) 45(3.5,-7.55) 46(4,-7.55) 47(4.5,-7.55) 48(5,-7.55) 49(5.5,-7.55) 50(6,-7.55) 76(6,7.55) 77(5.5,7.55) 78(5,7.55) 79(4.5,7.55) 80(4,7.55) 81(3.5,7.55) 82(3,7.55) 83(2.5,7.55) 84(2,7.55) 85(1.5,7.55) 86(1,7.55) 87(0.5,7.55) 88(0,7.55) 89(-0.5,7.55) 90(-1,7.55) 91(-1.5,7.55) 92(-2,7.55) 93(-2.5,7.55) 94(-3,7.55) 95(-3.5,7.55) 96(-4,7.55) 97(-4.5,7.55) 98(-5,7.55) 99(-5.5,7.55) 100(-6,7.55)
  silkscreen extent -7.67,-6.25 6.25,6.82, body extent -8,-8 8,8, height 1.5
SW-PB#1 [mm]
  rect 2.5x1 smd: 1(-3.992,2.25) 1(3.992,2.25) 2(-3.992,-2.25) 2(3.992,-2.25)
  silkscreen extent -3,-3.2 3,3.17, body extent -4.5,-3 4.5,3, height 5
SW-PB#2 [mm]
  rect 2x1.5 smd: 1(-3,0) 2(3,0)
  silkscreen extent -2.75,-1.75 2.75,1.75
"TS02N - SOP8" [mm] "Designed by Hadi Aghabeigi - PANIC Electronic"
  oval 2.2x0.6 smd: 1(0.14,0.41) 2(0.14,-0.86) 3(0.14,-2.13) 4(0.14,-3.4) 5(4.94,-3.4) 6(4.94,-2.13) 7(4.94,-0.86) 8(4.94,0.41)
  silkscreen extent 0.92,-4 3.44,1.62, body extent 0.54,-4 4.54,1, height 1.75
TSSOP-8 [mil]
  rect 65x13.5 smd: 1(-115.2,38.4) 2(-115.2,12.8) 3(-115.2,-12.8) 4(-115.2,-38.4) 5(115.2,-38.4) 6(115.2,-12.8) 7(115.2,12.8) 8(115.2,38.4)
  silkscreen extent -70,-40 70,40, body extent -126,-59 126,59, height 47
TSSOP-8N [mm]
  oval 1.4x0.45 smd: 1(-2.95,0.975) 2(-2.95,0.325) 3(-2.95,-0.325) 4(-2.95,-0.975) 5(2.95,-0.975) 6(2.95,-0.325) 7(2.95,0.325) 8(2.95,0.975)
  silkscreen extent -3.07,-1.5 1.85,1.87, body extent -2.25,-1.5 2.25,1.5, height 1.2
U.FL-R-SMT [mil]
  rect 44x89 smd: 1(-58.07,0) 1(59,0)
  rect 42x44 smd: 2(0,-61.02)
  silkscreen extent -52,-51 53,52
"WE-ASI_Actuator - Type L" [mm] "Inductor, 2-Leads, Body 18,54x15,24mm"
  rect 2.92x2.79 smd: 1(-7.685,0) 2(7.685,0)
  silkscreen extent -9.25,-7.6 9.25,7.6, body extent -9.27,-7.62 9.27,7.62, height 12
"WE-ASI_Actuator - Type M" [mm] "Inductor, 2-Leads"
  rect 3.75x9.5 smd: 1(-3.125,0) 2(3.125,0)
  silkscreen extent -0.95,-4.7 0.95,4.7, body extent -5.05,-4.5 5.05,4.5, height 6.5
WE-ASI_Sensor [mm] "Inductor, 2-Leads"
  rect 3x7.5 smd: 1(-2.5,0) 2(2.5,0)
  silkscreen extent -0.7,-3.65 0.7,3.65, body extent -3.95,-3.5 3.94,3.5, height 5
WE-CHSA_8090 [mm] "SMT High Current Inductor, 2-Leads, body 8.1x8.1mm"
  rect 1.65x2.5 smd: 1(-3.25,0) 2(3.25,0)
  silkscreen extent -4.2,-4.2 4.2,4.2, body extent -4.05,-4.05 4.05,4.05, height 9
WE-HCF_2920_Round [mm] "SMD High Current Inductor, body 28x25mm"
  rect 8x8.5 smd: 1(0,8.5) 2(0,-8.5)
  silkscreen extent -14,-12.5 14,12.5, body extent -13.65,-11.55 13.65,11.55, height 20.1
WE-HCI_7050#1 [mm] "SMT Flat Wire High Current Inductor, body 6.9x6.9mm"
  rect 2.2x2.7 smd: 1(0,2.55) 2(0,-2.55)
  silkscreen extent -3.6,-3.6 3.6,3.6, body extent -3.45,-3.5 3.45,3.5, height 5
WE-HCI_7050#2 [mm] "SMT Flat Wire High Current Inductor, body 6.9x6.9mm"
  rect 7x2.7 smd: 1(0,2.05) 2(0,-2.05)
  silkscreen extent -3.6,-3.6 3.6,3.6, body extent -3.45,-3.5 3.45,3.5, height 5
WE-LHMI_7030 [mm] "SMT Power Inductor, 2-Leads, body 6.6x6.6mm"
  rect 2.95x3.5 smd: 1(-2.725,0) 2(2.725,0)
  silkscreen extent -3.45,-3.45 3.45,3.45, body extent -3.65,-3.3 3.65,3.3, height 2.8
WE-SPC_4818 [mm] "SMD Shielded Power Inductor, body 4.8x4.8mm"
  rect 5.3x2 smd: 1(0,1.75) 2(0,-1.75)
  silkscreen extent -2.55,-0.45 2.55,0.45, body extent -2.41,-2.41 2.41,2.41, height 1.8
XCVR_MC60 [mil]
  oval 110x25 smd: 1(-310,275.59) 2(-310,236.22) 3(-310,196.85) 4(-310,157.48) 5(-310,118.11) 6(-310,78.74) 7(-310,39.37) 8(-310,0) 9(-310,-39.37) 10(-310,-78.74) 11(-310,-118.11) 12(-310,-157.48) 13(-310,-196.85) 14(-310,-236.22) 15(-310,-275.59) 28(310,-275.59) 29(310,-236.22) 30(310,-196.85) 31(310,-157.48) 32(310,-118.11) 33(310,-78.74) 34(310,-39.37) 35(310,0) 36(310,39.37) 37(310,78.74) 38(310,118.11) 39(310,157.48) 40(310,196.85) 41(310,236.22) 42(310,275.59)
  oval 25x110 smd: 16(-216.54,-363) 17(-177.17,-363) 18(-137.8,-363) 19(-98.43,-363) 20(-59.05,-363) 21(-19.68,-363) 22(19.69,-363) 23(59.06,-363) 24(98.43,-363) 25(137.8,-363) 26(177.17,-363) 27(216.54,-363) 43(216.54,363) 44(177.17,363) 45(137.8,363) 46(98.43,363) 47(59.06,363) 48(19.69,363) 49(-19.68,363) 50(-59.05,363) 51(-98.43,363) 52(-137.8,363) 53(-177.17,363) 54(-216.54,363)
  rect 45x45 smd: 55(-142,111) 56(-142,38) 57(-142,-34) 58(-142,-106.3) 59(-70.87,-177.17) 60(0,-177.17) 61(70.87,-177.17) 62(142,-112) 63(142,-39) 64(142,34) 65(142,107) 66(70.87,177.16) 67(0,177.16) 68(-70.87,177.16)
  silkscreen extent -379,-433 379,433, body extent -315,-368 315,368, height 83

## Part data
6.3*6.3 8.3*8.3 C9: library part SMD_ELEC_CAP, "SMD Electrolytic Capacitor"
0603: library part RES_100K_0805_1%, "Resistor SMD chip 100k Ohm 0.125W 1% 0805"
0603: library part Res, "Resistor"
0603-BLUE 0603-RED 0603-YELLOW: library part LED_SMD_Red_0805_6mcd, "LED 0805 SMD Red 6mcd 621nm"
0805: library part LED_SMD_Green_0805_12mcd, "LED 0805 SMD Green 12mcd 569nm"
0805: library part CAPC_4u7_0805, "Capacitor SMD Cer 4.7uF 10% 16V X5R 0805"
C3: library part PANACAP-47UF-16V-FK, "GENERIC CAPACITOR POLARISED"
C50: library part PANACAP-100UF-25V-FK, "GENERIC CAPACITOR POLARISED"
DO214: library part DIODE_SCHOTTKY_30BQ100TRPBF, "Diode Schottky SMD 40V 3A SMC"
INDUCTOR-10*10: library part CDRH105-150, "33uH Inductor, SMT, 3.4 A, 41 milliohm"
LED3: library part "LED DUAL G&Y", "DOUBLE INDICATOR 1XGREEN DIFFUSED 1XYELLOW DIFFUSED LED"
MINIMELF: library part DIODE_100V_500mW_MELF, "ZENNER"
P3: library part ZX62D-B-5P8
P4: "Header, 6-Pin"
P5: "Header, 4-Pin"
P6: "Micro SD Card Socket"
Q1: "P CHANNEL MOSFET"
S1: "Subminiator SPDT Switch"
S2: "Switch"
SOT23: library part MOSFET_RZR025P01TL, "MOSFET SMD P-CH 12V 2.5A 1W SOT23-3"
SOT223: library part AMS1117-x.x, "x.x Volt, 800mA Low-Dropout Linear Regulator, 4-pin SOT-223", Data=16-12-2016, Designer="Ali Hafizi"
TAN-A TANTAL-C TANTAL-D: library part "Tantalum Cap", "Solid Tantalum Chip Capacitor, Standard T491 Series - Industrial Grade"
TANTAL-B: library part PANACAP-10UF-16V-FK, "GENERIC CAPACITOR POLARISED"
U1: "MC60 is a quad-band full-featured GSM/GPRS module using LCC castellation package. With an extensive set of internet protocols _TCP, UDP, PPP, FTP, HTTP and SSL*_, it has integrated the GNSS technology for satellite navigation. Based on the latest 2G chipset, it has the optimal performance in SMS & data transmission as well as audio service even in harsh environments. It features Dual SIM Single Standby function."
U2_1: "8-bit AVR Microcontroller, 32KB Flash, 1KB EEPROM, 2KB SRAM, 32-pin TQFP, Industrial Grade (-40°C to 85°C)"
U4: library part "uBlox NEO-6Q"
U4_1: "PC817 Series 1 Channel 80 V 5000 Vrms General Purpose Photocoupler - DIP-4"
U5: library part MPU-6050
U6: library part AT45DB321D-SU
U7: "ARM Cortex-M4 32-bit MCU+FPU, 210 DMIPS, 1024 kB Flash, 192 kB Internal RAM, 82 I/Os, 100-pin LQFP, -40 to 85 degC, Tray"
U9: library part MP1584EN
U10: library part 25LC640AT-I/ST, "64K SPI Bus Serial EEPROM, 8-Pin TSSOP, Industrial Temperature, Tape and Reel"
U11: "SMD Gyroscope/Accelerometer/Magnetometer Sensor; 9-AXIS"
U12: "2-CH Sensitivity Calibration Capacitive Touch Sensor", PackageVersion=19-09-2019, PART.NO=TS02, Published=19-09-2019, Publisher="Hadi Aghabeigi"
UFL: library part U.FL-R-SMT
X2: library part SMACONNECTOR_EDGE
Y1: library part XTAL, "XTAL Crystal", ComponentLink1Description=Datasheet, ComponentLink2Description=Reference, Design Date=2017-1-3, Designer="ABBAS BASEREH", Mounting Technology="Surface Mount\Through-Hole", Status=Unreleased
Y2: library part "OSC 1.544MHz", "Oscillator 8MHz , 5 x 3.2 mm SMD , Supply :1.8 V ~ 5.0 V, ±100ppm"

## Via types
v1: diameter 1.05, hole 0.95, Top Layer to Bottom Layer, tented both sides, 1 vias
v2: diameter 0.85, hole 0.75, Top Layer to Bottom Layer, tented both sides, 1 vias

## Nets (pads, with @x,y where several pads share a name; then routed paths per layer and width w, separated by ;. In a path a pad name is that pad's centre, name@x,y a point inside that pad or via, vN(x,y) a via of type N, cw(c..) or ccw(c..) an arc to the next point about the centre after c; other vN are vias at no path point)
pads on no net: 6.3*6.3.1 6.3*6.3.2 8.3*8.3.1 8.3*8.3.2 0603-BLUE.0 0603-BLUE.A 0603-BLUE.K 0603-RED.0 0603-RED.A 0603-RED.K 0603-YELLOW.0 0603-YELLOW.A 0603-YELLOW.K 0603.0 0603.1 0603.2 0805.0 0805.1 0805.2 0805.A 0805.K 1206.1 1206.2 2835.+ 2835.- "SIM Holder1.1" "SIM Holder1.2" "SIM Holder1.3" "SIM Holder1.4" "SIM Holder1.5" "SIM Holder1.6" ANT1.D ANT1.GND1 ANT1.GND2 ANT1.GND3 ARAY-0603.1 ARAY-0603.2 ARAY-0603.3 ARAY-0603.4 ARAY-0603.5 ARAY-0603.6 ARAY-0603.7 ARAY-0603.8 C3.+ C3.- C9.1 C9.2 C50.1 C50.2 D2PAK-2P.1 D2PAK-2P.2 D2PAK-2P.3 D2PAK-5P.1 D2PAK-5P.2 D2PAK-5P.3 D2PAK-5P.4 D2PAK-5P.5 D2PAK-5P.6 D6.0 D6.1 D6.2 D6.3 D6.4 D6.5 D6.6 Designator17.1 Designator17.2 Designator20.1 Designator20.2 Designator73.1 Designator73.2 Designator73.3 Designator73.4 Designator240.1 Designator240.2 Designator242.1 Designator242.2 Designator243.1 Designator243.2 Designator244.1 Designator244.2 Designator245.1 Designator245.2 Designator248.1 Designator248.2 DO214.0 DO214.A DO214.K DPAK.1 DPAK.2 DPAK.3 IND-5.3*5.3.1 IND-5.3*5.3.2 IND-5.3*6.3.0 IND-5.3*6.3.1 IND-5.3*6.3.2 IND-7*7.1 IND-7*7.2 IND-8*7.1 IND-8*7.2 IND-8*8.1 IND-8*8.2 IND-10*9.1 IND-10*9.2 INDUCTOR-10*10.1 INDUCTOR-10*10.2 L3.1 L3.2 LED3.1 LED3.2 LED3.3 LED3.4 LED-YELLOW.1 LED-YELLOW.2 MINIMELF.0 MINIMELF.A MINIMELF.K P1.1 P1.2 P1.3 P1.4 P1.5 P1.6 P1.7 P1.8 P1.9 P1.10 P1.11 P1.12 P1.13 P1.14 P1.15 P1.16 P3.1 P3.2 P3.3 P3.4 P3.5 P3.6 P3.P3 P3.P4 P3.P5 P3.P6 P4.1 P4.2 P4.3 P4.4 P4.5 P4.6 P5.1 P5.2 P5.3 P5.4 P6.1 P6.2 P6.3 P6.4 P6.5 P6.6 P6.7 P6.8 P6.9 P6.G1 P6.G2 P6.G3 P6.G4 P6.None Q1.1 Q1.2 Q1.3 Q1.4 Q1.5 Q1.6 Q1.7 Q1.8 S1.1 S1.2 S1.3 S1.M2 S2.1 S2.2 SOT23.0 SOT23.1 SOT23.2 SOT23.3 SOT223.1 SOT223.2 SOT223.3 SOT223.4 SW3.1 SW3.2 SW3.3 SW3.4 TAN-A.1 TAN-A.2 TANTAL-B.1 TANTAL-B.2 TANTAL-C.1 TANTAL-C.2 TANTAL-D.1 TANTAL-D.2 U1.1 U1.2 U1.3 U1.4 U1.5 U1.6 U1.7 U1.8 U1.9 U1.10 U1.11 U1.12 U1.13 U1.14 U1.15 U1.16 U1.17 U1.18 U1.19 U1.20 U1.21 U1.22 U1.23 U1.24 U1.25 U1.26 U1.27 U1.28 U1.29 U1.30 U1.31 U1.32 U1.33 U1.34 U1.35 U1.36 U1.37 U1.38 U1.39 U1.40 U1.41 U1.42 U1.43 U1.44 U1.45 U1.46 U1.47 U1.48 U1.49 U1.50 U1.51 U1.52 U1.53 U1.54 U1.55 U1.56 U1.57 U1.58 U1.59 U1.60 U1.61 U1.62 U1.63 U1.64 U1.65 U1.66 U1.67 U1.68 U2_1.1 U2_1.2 U2_1.3 U2_1.4 U2_1.5 U2_1.6 U2_1.7 U2_1.8 U2_1.9 U2_1.10 U2_1.11 U2_1.12 U2_1.13 U2_1.14 U2_1.15 U2_1.16 U2_1.17 U2_1.18 U2_1.19 U2_1.20 U2_1.21 U2_1.22 U2_1.23 U2_1.24 U2_1.25 U2_1.26 U2_1.27 U2_1.28 U2_1.29 U2_1.30 U2_1.31 U2_1.32 U2_2.1 U2_2.2 U2_2.3 U2_2.5 U2_2.6 U2_2.7 U3.1 U3.2 U3.3 U3.4 U3.5 U3.6 U3.7 U3.8 U3.9 U3.10 U3.11 U3.12 U3.13 U3.14 U3.15 U3.16 U3.17 U3.18 U3.19 U3.20 U3.21 U3.22 U3.23 U3.24 U3.25 U3.26 U3.27 U3.28 U3.29 U3.30 U3.31 U3.32 U3.33 U3.34 U3.35 U3.36 U3.37 U3.38 U3.39 U3.40 U3.41 U3.42 U4.1 U4.2 U4.3 U4.4 U4.5 U4.6 U4.7 U4.8 U4.9 U4.10 U4.11 U4.12 U4.13 U4.14 U4.15 U4.16 U4.17 U4.18 U4.19 U4.20 U4.21 U4.22 U4.23 U4.24 U4_1.1 U4_1.2 U4_1.3 U4_1.4 U5.1 U5.2 U5.3 U5.4 U5.5 U5.6 U5.7 U5.8 U5.9 U5.10 U5.11 U5.12 U5.13 U5.14 U5.15 U5.16 U5.17 U5.18 U5.19 U5.20 U5.21 U5.22 U5.23 U5.24 U6.1 U6.2 U6.3 U6.4 U6.5 U6.6 U6.7 U6.8 U7.1 U7.2 U7.3 U7.4 U7.5 U7.6 U7.7 U7.8 U7.9 U7.10 U7.11 U7.12 U7.13 U7.14 U7.15 U7.16 U7.17 U7.18 U7.19 U7.20 U7.21 U7.22 U7.23 U7.24 U7.25 U7.26 U7.27 U7.28 U7.29 U7.30 U7.31 U7.32 U7.33 U7.34 U7.35 U7.36 U7.37 U7.38 U7.39 U7.40 U7.41 U7.42 U7.43 U7.44 U7.45 U7.46 U7.47 U7.48 U7.49 U7.50 U7.51 U7.52 U7.53 U7.54 U7.55 U7.56 U7.57 U7.58 U7.59 U7.60 U7.61 U7.62 U7.63 U7.64 U7.65 U7.66 U7.67 U7.68 U7.69 U7.70 U7.71 U7.72 U7.73 U7.74 U7.75 U7.76 U7.77 U7.78 U7.79 U7.80 U7.81 U7.82 U7.83 U7.84 U7.85 U7.86 U7.87 U7.88 U7.89 U7.90 U7.91 U7.92 U7.93 U7.94 U7.95 U7.96 U7.97 U7.98 U7.99 U7.100 U8.1 U8.2 U8.3 U8.4 U8.5 U9.1 U9.2 U9.3 U9.4 U9.5 U9.6 U9.7 U9.8 U10.1 U10.2 U10.3 U10.4 U10.5 U10.6 U10.7 U10.8 U11.1 U11.2 U11.3 U11.4 U11.5 U11.6 U11.7 U11.8 U11.9 U11.10 U11.11 U11.12 U11.13 U11.14 U11.15 U11.16 U11.17 U11.18 U11.19 U11.20 U11.21 U11.22 U11.23 U11.24 U11.25 U11_1.1 U11_1.2 U11_1.3 U11_1.4 U11_1.5 U11_1.6 U11_1.7 U11_1.8 U12.1 U12.2 U12.3 U12.4 U12.5 U12.6 U12.7 U12.8 UFL.1 UFL.2 X1.1 X1.2 X1.3 X1.4 X2.GND@1 X2.GND@2 X2.GND@3 X2.GND@4 X2.P Y1.1 Y1.2 Y2.1 Y2.2 Y2.3 Y2.4
copper on no net: | length 945.1
  Top Layer w0.254: -10.45,-39.1 117.125,-39.1 ; 1.625,-105.175 1.625,-34.9 ; 16.325,-105.175 16.325,-34.925 ; 32.9,-105.125 32.9,-34.9 ; 57.975,-105.15 57.975,-34.875 ; 74.025,-105.25 74.025,-34.975 ; 90.55,-105.175 90.55,-34.9 ; -10.45,-105.175 117.225,-105.175 117.225,-34.9 -10.45,-34.9 -10.45,-105.175
  other v1: 26.074,62.66
  other v2: 35.074,70.96

## Other copper
Top Layer:
  text "CAP-CERAMIC-SMD" at 2.475,-37.4 h1.52
  text "LED-SMD" at 17.875,-37.4 h1.52
  text "CAP-TANTAL" at 35.2,-37.5 h1.52
  text "RES-SMD" at -8.175,-37.525 h1.52

## Text inside footprints (layer, text, board x,y; h text height)
C3: Top Overlay "+" at 52.8,-75.15 h1 r180
C50: Top Overlay "+" at 47.9,-84.55 h0.89
Designator240: Top Overlay "+" at 44.6,-98.6 h1
"SIM Holder1": Top Overlay "MICRO" at 33.134,69.59 h1.1 r270; Top Overlay "NANO" at 26.984,64.09 h1.1 r90